# Altium PCB I2C_level_shifter.PcbDoc
Units mil, origin at the board's own origin, x right, y up, seen from the top; angles counter-clockwise.
Board outline 800 x 490 mil, 2 copper layers (Top Layer, Bottom Layer), stack 65.792 mil thick; 13 components, 8 nets, 34 pads, 0 vias.
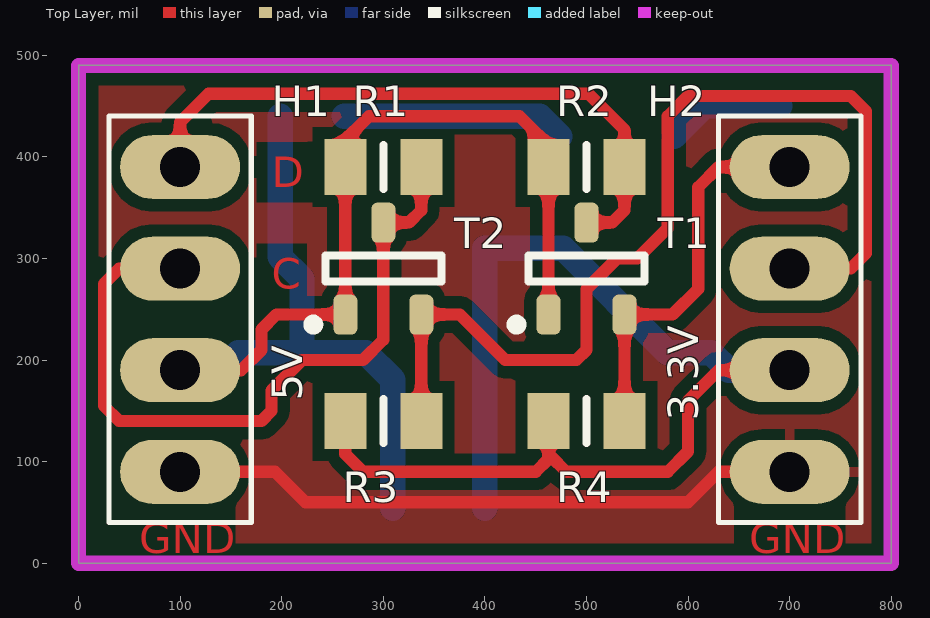
[diagram p0: Top Layer view]
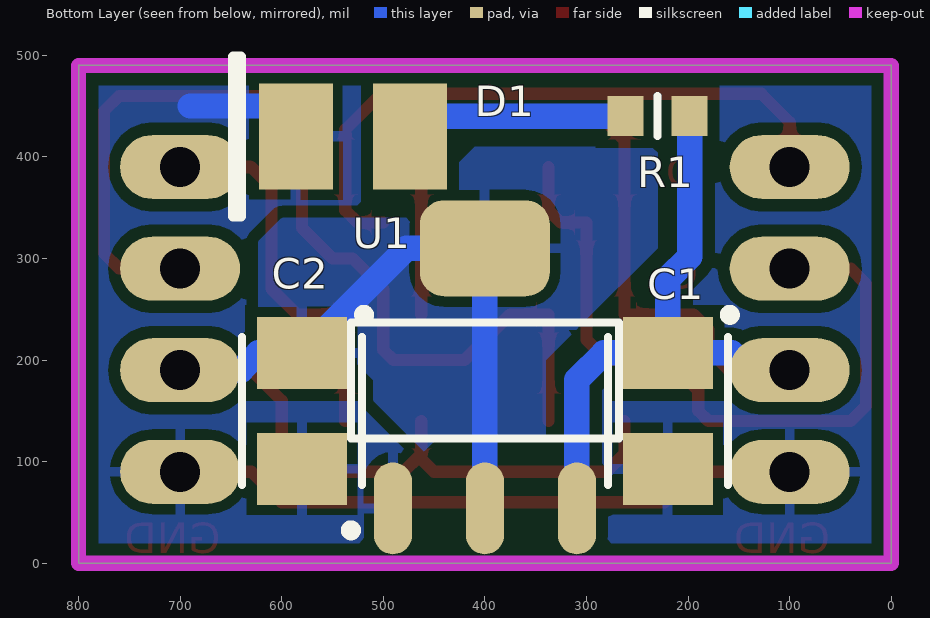
[diagram p1: Bottom Layer view, seen from below]
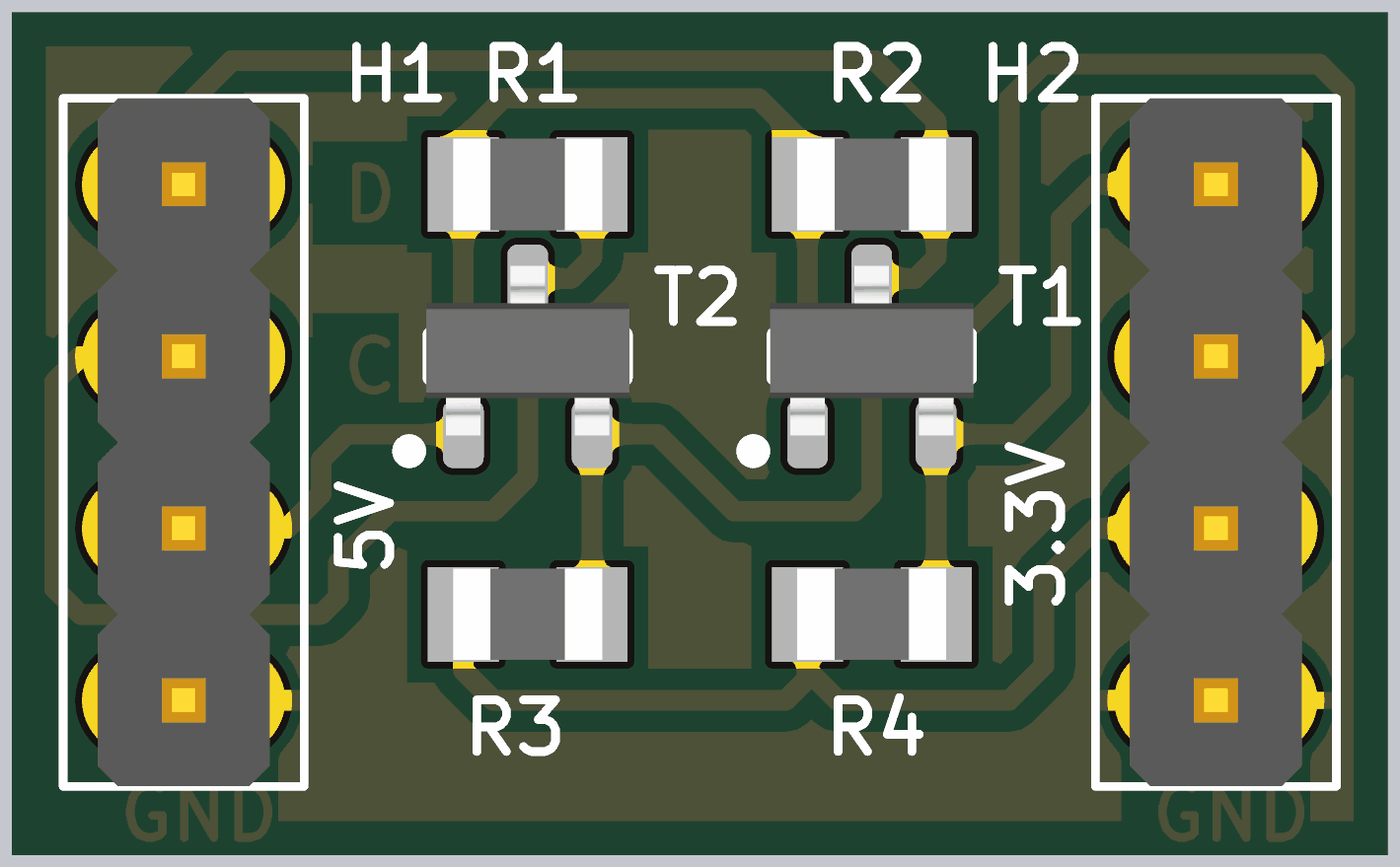
[diagram p2: 3D render of the assembled board from above, using the file's embedded part models]
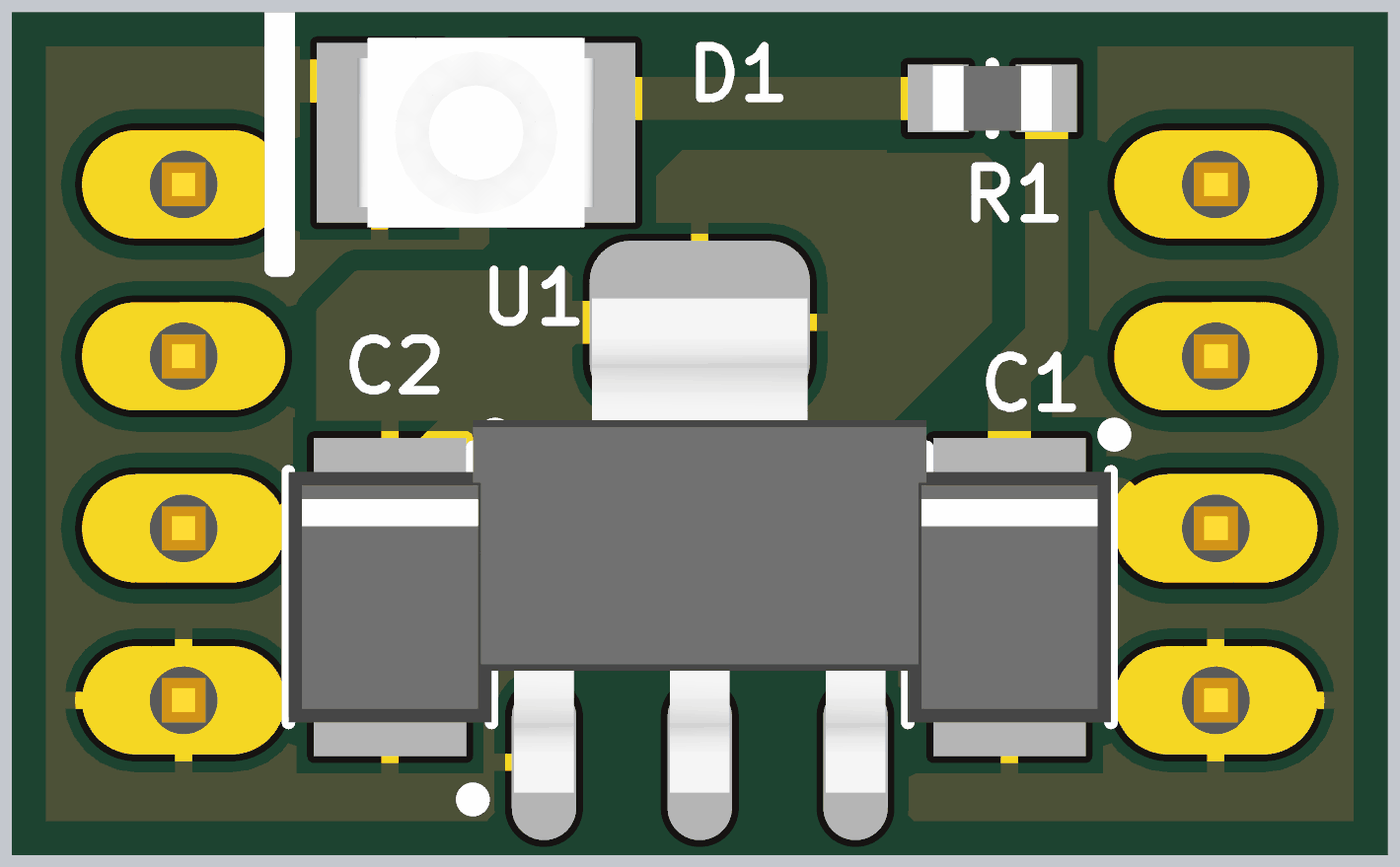
[diagram p3: 3D render of the assembled board from below, using the file's embedded part models]

## Layer stack, top to bottom
Top Solder: solder mask 0.4, Solder Resist, Dk 3.5
Top Layer: signal copper 1.4
Dielectric 1: dielectric 62.9921, FR-4, Dk 4.8
Bottom Layer: signal copper 1.4
Bottom Solder: solder mask 0.4, Solder Resist, Dk 3.5

## Board outline
0,0 800,0 800,490 0,490

## Design rules (kind name [scope] priority, off if disabled: settings)
Clearance [All] p1: gap=10 ignorepadtopadclearanceinfootprint=FALSE except(0: Arc-Hole Track-Hole SMDPad-Hole THPad-Hole Via-Hole Fill-Hole Poly-Hole Region-Hole Text-Hole; 8: SMDPad-SMDPad; 12: Arc-Poly Track-Poly SMDPad-Poly THPad-Poly Via-Poly Fill-Poly Poly-Poly)
HoleSize [All] p1: absolutevalues=TRUE maxlimit=125.98 minlimit=1 maxpercent=80.000 minpercent=20.000
PolygonConnect PolygonConnect_Via_Stitch [IsStitchingVia] p1: connectstyle=Direct reliefconductorwidth=10 reliefentries=4 polygonreliefangle="90 Angle" airgapwidth=10
PolygonConnect [All] p2: connectstyle=Relief reliefconductorwidth=10 reliefentries=4 polygonreliefangle="90 Angle" airgapwidth=10
RoutingVias [All] p1: holewidth=23.62 width=47.24 viastyle="Through Hole" minholewidth=11.81 minwidth=23.62 maxholewidth=39.37 maxwidth=78.74
SolderMaskExpansion [All] p1: expansion=4
Width [All] p1: maxlimit=200 minlimit=8 preferedwidth=10
29 further rules are at their usual default settings.

## Classes and differential pairs
component class I2C_level_shifter: C1 C2 D1 H1 H2 R1 R2 R3 R4 T1 T2 U1

## Components (designator, comment, footprint, x,y, rotation, side; value= is the part's Value field where it differs from the comment)
C1 "10uF" CAP_B_3528 220,150 r270 bottom
C2 "10uF" CAP_B_3528 580,150 r270 bottom
D1 "*" "PLCC2 - 3528" 530,420 r180 bottom
H1 "H-1x4" J1X4 100,240 r90 top
H2 "H-1x4" J1X4 700,240 r90 top
R1 "220" 0603_res 230,440 r180 bottom
R1 "10K" 0805_RES 300,390 r180 top
R2 "10K" 0805_RES 500,390 r180 top
R3 "10K" 0805_RES 300,140 r180 top
R4 "10K" 0805_RES 500,140 r180 top
T1 "BSS138" SOT23-3_0.95mm 500,290 r90 top
T2 "BSS138" SOT23-3_0.95mm 300,290 r90 top
U1 "LM1117" SOT223 400,180 r90 bottom

## Footprints (in the part's own frame and the unit in brackets; to place one, negate y for a bottom-side part, rotate by r counter-clockwise, add the part's x,y. Pads: shape width x height; smd on the part's side, far side on the other; paste and mask are expansions set on the pad)
0603_res [mm] "Chip Resistor, EIA 0603, Metric 1608, Body 1.6x0.8mm, IPC Medium Density"
  rect 0.9x1 smd: 1(-0.8,0) 2(0.8,0)
  silkscreen extent 0,-0.5 0,0.5, body extent -0.87,-0.47 0.88,0.48, height 0.55
0805_RES [mm] "Chip Resistor, EIA 0805, Metric 2012, Body 2.0x1.25mm, IPC Medium Density"
  rect 1.05x1.4 smd: 1(-0.95,0) 2(0.95,0)
  silkscreen extent 0,-0.55 0,0.55, body extent -1.1,-0.67 1.1,0.68, height 0.7
CAP_B_3528 [mm] "Capacitor, Polarized, Molded  Body 3.5x2.8mm, IPC Medium Density"
  rect 1.8x2.25 smd: 1(-1.45,0) 2(1.45,0)
  silkscreen extent -2.52,-1.5 1.85,1.67, body extent -1.85,-1.5 1.85,1.5, height 2.1
J1X4 [mm]
  oval 1.6x3 hole 1: 1(-3.81,0) 2(-1.27,0) 3(1.27,0) 4(3.81,0)
  silkscreen extent -5.08,-1.78 5.08,1.78, body extent -5.08,-1.27 5.08,1.27, height 10.1
"PLCC2 - 3528" [mm] "DFN, 2-Leads, Body 2.80x3.50mm, Pitch 2.85mm, IPC Low Density"
  rect 1.85x2.65 smd: 1(-1.425,0) 2(1.425,0)
  silkscreen extent -3,-2 -2.8,2, body extent -1.75,-1.4 1.75,1.4, height 1.9
SOT23-3_0.95mm [mm] "SOT23, 3 pin, Pitch 0.95mm - 1.3mm W X 2.9mm L X 1.1mm H, IPC Medium Density"
  rrect50% 1x0.6 smd: 1(-1.15,0.95) 2(-1.15,-0.95) 3(1.15,0)
  silkscreen extent -1.52,-1.45 0.33,1.87, body extent -1.17,-1.5 1.33,1.5, height 1.1
SOT223 [mm] "SOT223, 2.30mm pitch; 3 pin, 3.70mm W X 6.70mm L, IPC Medium Density"
  oval 2.3x0.95 smd: 1(-3.2,2.3) 2(-3.2,0) 3(-3.2,-2.3)
  rrect50% 2.4x3.25 smd: 4(3.3,0)
  silkscreen extent -3.87,-3.35 1.45,3.48, body extent -3.65,-3.35 3.65,3.35, height 1.81

## Part data
C1 C2: library part Cond_Pol_SMD, "Polarised capacitor"
D1: library part LED, "Generic LED"
R1 R1 R2 R3 R4: library part Resistor_SMD, "Resistor - 1%"
T1 T2: library part "TZ_N-Ch MOSFET", "N-CHANNEL MOSFET WITH DIODE"
U1: "3-Terminal Regulator 1=GND 2=OUT 3=IN 4=OUT"

## Nets (pads, with @x,y where several pads share a name; then routed paths per layer and width w, separated by ;. In a path a pad name is that pad's centre, name@x,y a point inside that pad or via, vN(x,y) a via of type N, cw(c..) or ccw(c..) an arc to the next point about the centre after c; other vN are vias at no path point)
3.3V: C2.1 H2.2 R3.2 R4.2 U1.2 U1.4 | length 1199.9
  Top Layer w12: R3.2 262.6,107.4 280,90 450,90 462.6,102.6 R4.2 ; 465,105 480,90 580,90 600,110 600,160 630,190 H2.2
  Bottom Layer w25: U1.2 U1.4 477.17,309.92 C2.1 622.91,207.09 640,190 H2.2
5V: C1.1 H1.2 R1.2 R2.2 T1.1 T2.1 U1.3 | length 1353
  Top Layer w12: H1.2 160,190 180,210 180,230 194.72,244.72 T2.1 262.6,390 262.6,416.64 285.95,440 434.05,440 462.6,411.45 R2.2 T1.1
  Bottom Layer w25: H1.2 140,190 157.09,207.09 C1.1 ; R1.2@198.5,440 198.5,301.5 220,280 C1.1 ; U1.3 309.45,180.55 282.91,207.09 C1.1
GND: C1.2 C2.2 D1.1 H1.1 H2.1 U1.1 | length 745.3
  Top Layer w12: H1.1 193.5,90 223.5,60 600,60 630,90 H2.1
  Bottom Layer w25: D1.1 616.1,450 690,450 ; H2.1@697.09,92.91 H2.1
NetD1_2: D1.2 R1.1@261.5,440 | length 220.7
  Bottom Layer w25: R1.1@261.5,440 453.9,440 D1.2
SCL_3.3V: H2.3 R3.1 T2.2 | length 995.6
  Top Layer w12: R3.1 T2.2 375.28,244.72 420,200 490,200 500,210 500,270 530,300 550,300 580,330 580,440 600,460 760,460 775.05,444.95 775.05,305.05 760,290 H2.3
SCL_5V: H1.3 R1.1@337.4,390 T2.3 | length 727.6
  Top Layer w12: H1.3 40,290 24.95,274.95 24.95,155.05 40,140 180,140 190,150 190,170 220,200 280,200 300,220 T2.3 325.28,335.28 337.4,347.4 R1.1@337.4,390
SDA_3.3V: H2.4 R4.1 T1.2 | length 386.1
  Top Layer w12: R4.1 T1.2 584.72,244.72 610,270 610,370 630,390 H2.4
SDA_5V: H1.4 R2.1 T1.3 | length 629.3
  Top Layer w12: H1.4 100,434.05 127.95,462 502.05,462 537.4,426.64 R2.1 537.4,347.4 525.28,335.28 T1.3

## Polygon pours and split planes (outlines as drawn)
GND on Top Layer "GND" (solid, pour order 1): 0,490 800,490 800,0 0,0
3.3V on Bottom Layer "GND" (solid, pour order 0): 400,230 310,230 230,310 230,410 410,410 430,390 430,360 450,340 600,340 620,320 622.91,317.09 622.91,207.09 537.09,207.09 510,180 510,160 460,110 450,120 340,120 340,200 320,220 310,230
GND on Bottom Layer "GND" (solid, pour order 2): 0,490 800,490 800,0 0,0

## Keep-outs
Keep-Out Layer:
  the board outline again, w15

## Other copper
Top Layer:
  text "D" at 190,370 h30
  text "C" at 190,270 h30
  text "GND" at 60,10 h30
  text "GND" at 660,10 h30

## Silkscreen, mask and mechanical layers (free items; w line width, h text height)
Top Overlay:
  text "5V" at 220,160 h30 r90
  text "3.3V" at 610,140 h30 r90

## Dimensions
0,0 to 800,0 on Mechanical 1
800,0 to 800,490 on Mechanical 1